# Altium PCB 24V-7A-Power-Board-v2.0.PcbDoc (part 3 of 5)
Units mil, origin at the board's own origin, x right, y up, seen from the top; angles counter-clockwise.
Board outline 4921.26 x 6102.36 mil, 2 copper layers (Top Layer, Bottom Layer); 158 components, 79 nets, 394 pads, 81 vias.
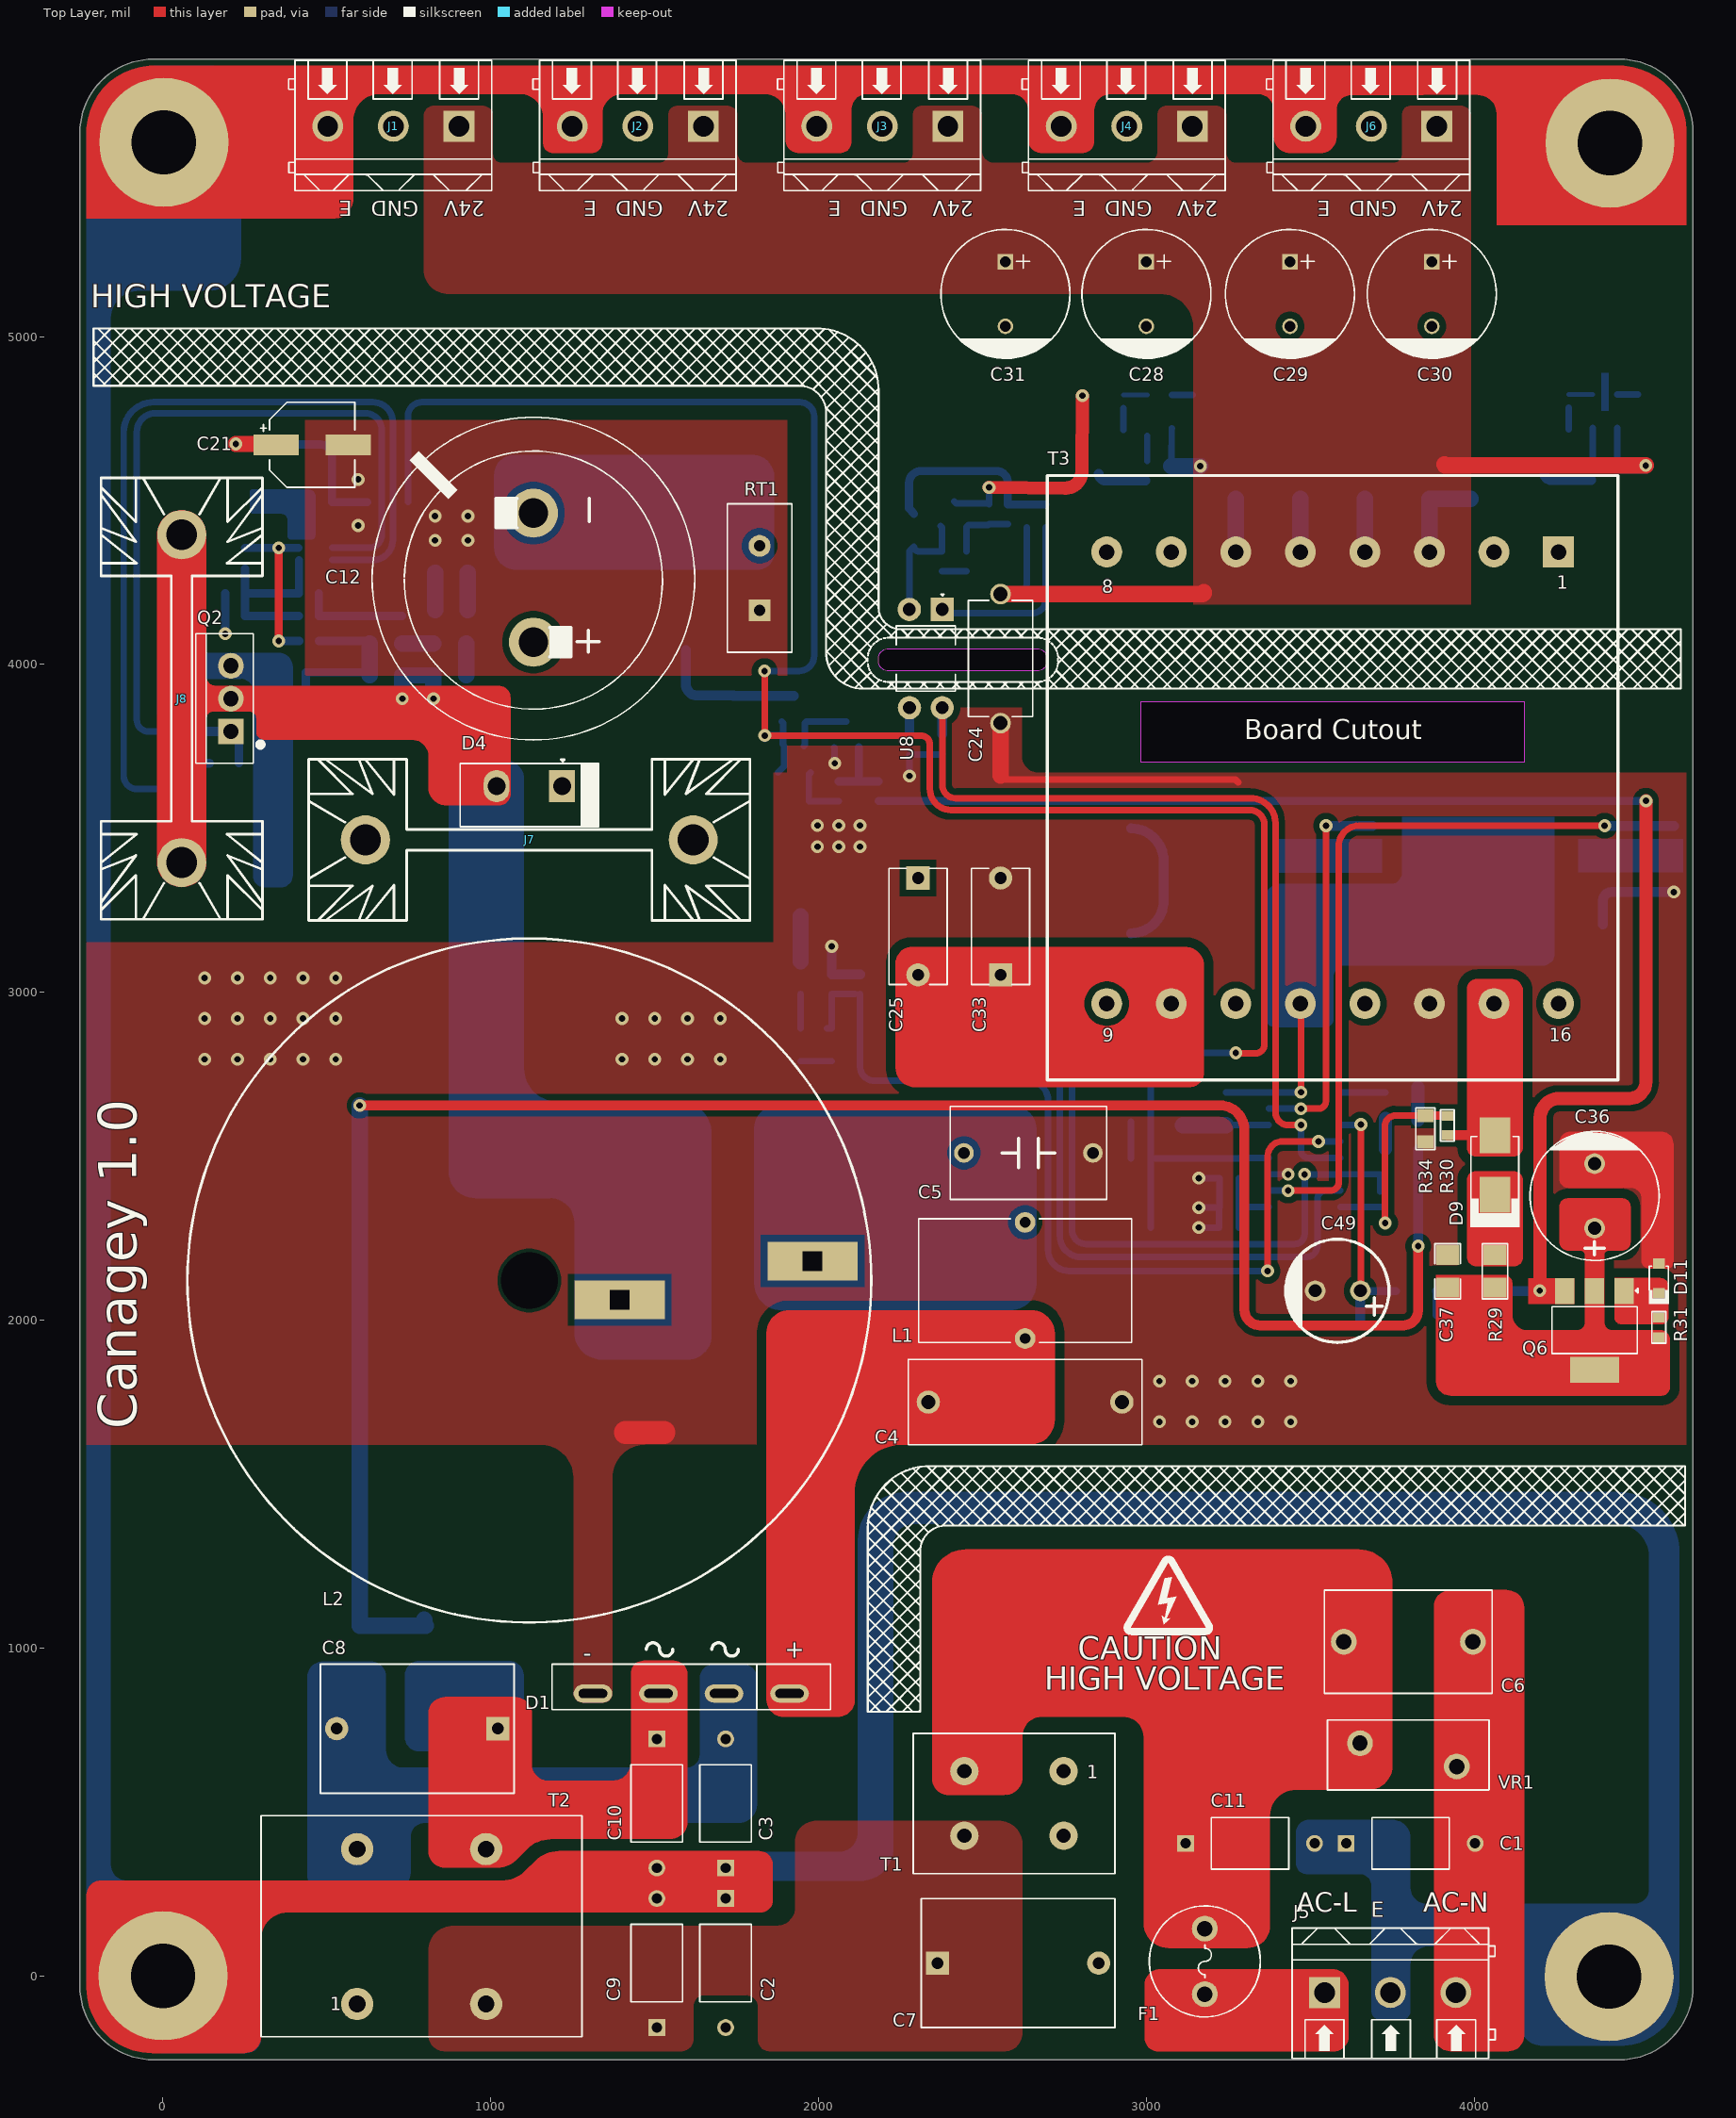
[diagram p0: Top Layer view]

## Part data (continued)
R3 R6 R7 R10: library part RC1206FR-073M3L, "RES 3.3M OHM 1% 1/4W 1206", LCSC Part Number=C137288, Manufacturer=Yageo, Voltage Rating (AC)=200V, ComponentLink1Description=https://datasheet.ciiva.com/11809/0900766b80c6630a-11809505.pdf?src-supplier=Rs, ComponentLink1URL=https://datasheet.ciiva.com/11809/0900766b80c6630a-11809505.pdf?src-supplier=Rs, ComponentLink2Description=https://datasheet.ciiva.com/2511/pyu-rc1206-51-rohs-l-4-2511094.pdf?src-supplier=Digikey, ComponentLink2URL=https://datasheet.ciiva.com/2511/pyu-rc1206-51-rohs-l-4-2511094.pdf?src-supplier=Digikey, ComponentLink3Description=https://datasheet.ciiva.com/2511/pyu-rc1206-51-rohs-l-4-2511095.pdf?src-supplier=Digikey, ComponentLink3URL=https://datasheet.ciiva.com/2511/pyu-rc1206-51-rohs-l-4-2511095.pdf?src-supplier=Digikey, ComponentLink4Description=https://datasheet.ciiva.com/2511/pyu-rc1206-51-rohs-l-4-2511096.pdf?src-supplier=Digikey, ComponentLink4URL=https://datasheet.ciiva.com/2511/pyu-rc1206-51-rohs-l-4-2511096.pdf?src-supplier=Digikey, ComponentLink5Description=https://datasheet.ciiva.com/17420/pyu-rc1206-51-rohs-l-4-17420140.pdf?src-supplier=Future+Electronics, ComponentLink5URL=https://datasheet.ciiva.com/17420/pyu-rc1206-51-rohs-l-4-17420140.pdf?src-supplier=Future+Electronics, Item Type=Resistor, Manufacturer Part Number=RC1206FR-073M3L, Pricing="5000=0.0038, 20000=0.0036, 75000=0.0034, 200000=0.0032, 500000=0.003 (USD)", RoHS=Yes, Stock=130000, Supplier="Future Electronics"
R5 R27 R32: library part CRCW060310R0FKEA, "RES SMD 10 OHM 1% 1/10W 0603", Case Code (Imperial)=0603, Case Code (Metric)=1608, LCSC Part Number=C844919, Manufacturer=Vishay, Max Operating Temperature=155°C, Max Power Dissipation=100mW, Min Operating Temperature=-55°C, Package Quantity=10, Resistance Tolerance=1%, Resistor Type="Thick Film", Temperature Coefficient=100ppm/°C, Voltage Rating=75V, Case/Package=0603, ComponentLink1Description=https://datasheet.ciiva.com/11808/0900766b80d98afc-11808660.pdf?src-supplier=Rs, ComponentLink1URL=https://datasheet.ciiva.com/11808/0900766b80d98afc-11808660.pdf?src-supplier=Rs, ComponentLink2Description=https://datasheet.ciiva.com/26316/fld-crcw-e3-data-en-26316582.pdf?src-supplier=Distrelec, ComponentLink2URL=https://datasheet.ciiva.com/26316/fld-crcw-e3-data-en-26316582.pdf?src-supplier=Distrelec, ComponentLink3Description=https://datasheet.ciiva.com/2465/dcrcwe3-2465700.pdf?src-supplier=Digikey, ComponentLink3URL=https://datasheet.ciiva.com/2465/dcrcwe3-2465700.pdf?src-supplier=Digikey, ComponentLink4Description=https://datasheet.ciiva.com/16781/70201119-16781847.pdf?src-supplier=Allied+Electronics, ComponentLink4URL=https://datasheet.ciiva.com/16781/70201119-16781847.pdf?src-supplier=Allied+Electronics, ComponentLink5Description=https://datasheet.ciiva.com/22673/1697337-22673071.pdf?src-supplier=Element14, ComponentLink5URL=https://datasheet.ciiva.com/22673/1697337-22673071.pdf?src-supplier=Element14, ComponentLink6Description=https://datasheet.ciiva.com/2465/dcrcwe3-2465701.pdf?src-supplier=Digikey, ComponentLink6URL=https://datasheet.ciiva.com/2465/dcrcwe3-2465701.pdf?src-supplier=Digikey, ComponentLink7Description=https://datasheet.ciiva.com/2465/dcrcwe3-2465699.pdf?src-supplier=Digikey, ComponentLink7URL=https://datasheet.ciiva.com/2465/dcrcwe3-2465699.pdf?src-supplier=Digikey, ComponentLink8Description=https://datasheet.ciiva.com/5547/dcrcwe3-109170-5547342.pdf?src-supplier=Mouser, ComponentLink8URL=https://datasheet.ciiva.com/5547/dcrcwe3-109170-5547342.pdf?src-supplier=Mouser, Construction=Rectangular, Contact Plating=Tin, Depth=0.85mm, Features="Automotive AEC-Q200", Height=0.45mm, Item Type=Resistors, Lead Free=5697LeadFree, Length=1.55mm, Manufacturer Part Number=CRCW060310R0FKEA, Military Standard=Not, Number of Terminations=2, Packaging="Tape and Reel", Pins=2, Power Rating=100mW, Pricing="1=0.1, 10=0.017, 50=0.017, 100=0.01, 1000=0.008, 10000=0.005 (USD)", Reach SVHC Compliant=Unknown, RoHS=Yes, RoHS Compliant=Yes, Series=CRCW, Stock=648208, Supplier=Mouser, Technology="THICK FILM", Termination=SMD/SMT, Tolerance=1%, Voltage Rating (DC)=75V, Weight=7.1E-05oz, Width=0.033inch
R8: library part CRCW06031R00FKEA, "RES SMD 1 OHM 1% 1/10W 0603", Case Code (Imperial)=0603, Case Code (Metric)=1608, LCSC Part Number=C844752, Manufacturer="Vishay Dale", Max Operating Temperature=155°C, Max Power Dissipation=100mW, Min Operating Temperature=-55°C, Package Quantity=5000, Ratings=AEC-Q200, Resistance Tolerance=1%, Resistor Type="Thick Film", Temperature Coefficient=100ppm/°C, Voltage Rating=75V, Case/Package=0603, ComponentLink1Description=https://datasheet.ciiva.com/7792/1359337-7792119.pdf?src-supplier=Element14, ComponentLink1URL=https://datasheet.ciiva.com/7792/1359337-7792119.pdf?src-supplier=Element14, ComponentLink2Description=https://datasheet.ciiva.com/3257/dcrcwe3-3257225.pdf?src-supplier=Avnet, ComponentLink2URL=https://datasheet.ciiva.com/3257/dcrcwe3-3257225.pdf?src-supplier=Avnet, ComponentLink3Description=https://datasheet.ciiva.com/2465/dcrcwe3-2465530.pdf?src-supplier=Digikey, ComponentLink3URL=https://datasheet.ciiva.com/2465/dcrcwe3-2465530.pdf?src-supplier=Digikey, ComponentLink4Description=https://datasheet.ciiva.com/2465/dcrcwe3-2465528.pdf?src-supplier=Digikey, ComponentLink4URL=https://datasheet.ciiva.com/2465/dcrcwe3-2465528.pdf?src-supplier=Digikey, ComponentLink5Description=https://datasheet.ciiva.com/5541/dcrcwe3-109170-5541726.pdf?src-supplier=Mouser, ComponentLink5URL=https://datasheet.ciiva.com/5541/dcrcwe3-109170-5541726.pdf?src-supplier=Mouser, Construction=Rectangular, Contact Plating=Tin, Depth=0.85mm, Features="Automotive AEC-Q200", Height=0.45mm, Item Type=Resistor, Lead Free=5697LeadFree, Length=1.55mm, Manufacturer Part Number=CRCW06031R00FKEA, Military Standard=Not, Number of Terminations=2, Packaging="Tape and Reel", Pins=2, Power Rating=100mW, Pricing="1=0.1, 10=0.024, 50=0.024, 100=0.014, 1000=0.011, 10000=0.006 (USD)", Radiation Hardening=No, Reach SVHC Compliant=Unknown, RoHS=Yes, RoHS Compliant=Yes, Series=CRCW, Stock=303523, Supplier=Mouser, Termination=SMD/SMT, Tolerance=1%, Voltage Rating (DC)=75V, Weight=7.1E-05oz, Width=0.85mm
R9: library part RC0603FR-0782K5L, "RES 82.5K OHM 1% 1/10W 0603", LCSC Part Number=C185310, Manufacturer=Yageo, Voltage Rating (DC)=50V, ComponentLink1Description=https://datasheet.ciiva.com/2519/pyu-r-int-thick-7-2519111.pdf?src-supplier=Digikey, ComponentLink1URL=https://datasheet.ciiva.com/2519/pyu-r-int-thick-7-2519111.pdf?src-supplier=Digikey, ComponentLink2Description=https://datasheet.ciiva.com/2519/pyu-r-int-thick-7-2519112.pdf?src-supplier=Digikey, ComponentLink2URL=https://datasheet.ciiva.com/2519/pyu-r-int-thick-7-2519112.pdf?src-supplier=Digikey, ComponentLink3Description=https://datasheet.ciiva.com/2519/pyu-r-int-thick-7-2519113.pdf?src-supplier=Digikey, ComponentLink3URL=https://datasheet.ciiva.com/2519/pyu-r-int-thick-7-2519113.pdf?src-supplier=Digikey, Item Type=Resistor, Lead Free=5697LeadFree, Manufacturer Part Number=RC0603FR-0782K5L, Pricing="5000=0.00112 (USD)", RoHS=Yes, Stock=165000, Supplier=Avnet
R11: library part RC0603FR-0736K5L, "RES 36.5K OHM 1% 1/10W 0603", LCSC Part Number=C137738, Manufacturer=YAGEO, Package=0603, ComponentLink1Description=LCSC, ComponentLink1URL=https://www.lcsc.com/product-detail/Chip-Resistor-Surface-Mount_YAGEO-RC0603FR-0736K5L_C137738.html, Item Type=Resistor, Manufacturer Part Number=RC0603FR-0736K5L
R12: library part RC0603FR-07120KL, "RES 120K OHM 1% 1/10W 0603", Case Code (Imperial)=0603, Case Code (Metric)=1608, LCSC Part Number=C114607, Manufacturer=Yageo, Max Operating Temperature=155°C, Max Power Dissipation=100mW, Min Operating Temperature=-55°C, Package Quantity=5000, Resistance Tolerance=1%, Resistor Type="Thick Film", Temperature Coefficient=100ppm/°C, Voltage Rating=50V, Working Voltage=75V, Case/Package=0603, ComponentLink1Description=https://datasheet.ciiva.com/11808/0900766b80f96399-11808757.pdf?src-supplier=Rs, ComponentLink1URL=https://datasheet.ciiva.com/11808/0900766b80f96399-11808757.pdf?src-supplier=Rs, ComponentLink2Description=https://datasheet.ciiva.com/2454/pyu-r-int-thick-7-2454739.pdf?src-supplier=Digikey, ComponentLink2URL=https://datasheet.ciiva.com/2454/pyu-r-int-thick-7-2454739.pdf?src-supplier=Digikey, ComponentLink3Description=https://datasheet.ciiva.com/2454/pyu-r-int-thick-7-2454740.pdf?src-supplier=Digikey, ComponentLink3URL=https://datasheet.ciiva.com/2454/pyu-r-int-thick-7-2454740.pdf?src-supplier=Digikey, ComponentLink4Description=https://datasheet.ciiva.com/2454/pyu-r-int-thick-7-2454738.pdf?src-supplier=Digikey, ComponentLink4URL=https://datasheet.ciiva.com/2454/pyu-r-int-thick-7-2454738.pdf?src-supplier=Digikey, ComponentLink5Description=https://datasheet.ciiva.com/7746/443971-7746247.pdf?src-supplier=Element14, ComponentLink5URL=https://datasheet.ciiva.com/7746/443971-7746247.pdf?src-supplier=Element14, ComponentLink6Description=https://datasheet.ciiva.com/7746/443971-7746246.pdf?src-supplier=Element14, ComponentLink6URL=https://datasheet.ciiva.com/7746/443971-7746246.pdf?src-supplier=Element14, Depth=0.8mm, Features="Moisture Resistant", Height=0.022inch, Item Type=Resistors, Lead Free=5697LeadFree, Lead Pitch=2.54mm, Length=0.063inch, Manufacturer Part Number=RC0603FR-07120KL, Number of Terminations=2, Packaging="Tape and Reel", Pins=2, Power Rating=100mW, Pricing="5000=0.0022, 50000=0.0021, 150000=0.0021, 375000=0.002, 1000000=0.0019 (USD)", Radiation Hardening=5898YesNo, Reach SVHC Compliant=Unknown, RoHS=Yes, RoHS Compliant=Yes, Series=RC, Stock=3405000, Supplier="Future Electronics", Technology="THICK FILM", Termination=SMD/SMT, Tolerance=1%, Voltage Rating (AC)=50V, Voltage Rating (DC)=50V, Width=0.031inch
R13: library part RC0603FR-073KL, "RES 3K OHM 1% 1/10W 0603", Case Code (Imperial)=0603, Case Code (Metric)=1608, LCSC Part Number=C126358, Manufacturer=Yageo, Max Operating Temperature=155°C, Max Power Dissipation=100mW, Min Operating Temperature=-55°C, Resistance Tolerance=1%, Resistor Type="Thick Film", Temperature Coefficient=100ppm/°C, Voltage Rating=50V, Case/Package=0603, ComponentLink1Description=http://www.farnell.com/datasheets/2167052.pdf?src-supplier=Farnell, ComponentLink1URL=http://www.farnell.com/datasheets/2167052.pdf?src-supplier=Farnell, ComponentLink2Description=http://www.mouser.com/ds/2/447/RC0603-272842.pdf?src-supplier=Mouser, ComponentLink2URL=http://www.mouser.com/ds/2/447/RC0603-272842.pdf?src-supplier=Mouser, ComponentLink3Description=https://www.verical.com/server-webapp/html/getDatasheet?partID=135099&src-supplier=Verical, ComponentLink3URL=https://www.verical.com/server-webapp/html/getDatasheet?partID=135099&src-supplier=Verical, ComponentLink4Description=http://www.farnell.com/datasheets/2167052.pdf?src-supplier=Element14, ComponentLink4URL=http://www.farnell.com/datasheets/2167052.pdf?src-supplier=Element14, ComponentLink5Description=http://www.yageo.com/documents/recent/PYu-RC_Group_51_RoHS_L_10.pdf?src-supplier=Digikey, ComponentLink5URL=http://www.yageo.com/documents/recent/PYu-RC_Group_51_RoHS_L_10.pdf?src-supplier=Digikey, ComponentLink6Description=http://www.yageo.com/documents/recent/PYu-RC_Group_51_RoHS_L_9.pdf?src-supplier=Digikey, ComponentLink6URL=http://www.yageo.com/documents/recent/PYu-RC_Group_51_RoHS_L_9.pdf?src-supplier=Digikey, ComponentLink7Description=https://datasheet.octopart.com/RC0603FR-073KL-Yageo-datasheet-8328172.pdf?src-supplier=Farnell, ComponentLink7URL=https://datasheet.octopart.com/RC0603FR-073KL-Yageo-datasheet-8328172.pdf?src-supplier=Farnell, ComponentLink8Description=http://www.yageo.com/documents/recent/PYu-RC0603_51_RoHS_L_7.pdf?src-supplier=Future+Electronics, ComponentLink8URL=http://www.yageo.com/documents/recent/PYu-RC0603_51_RoHS_L_7.pdf?src-supplier=Future+Electronics, ComponentLink9Description=https://datasheet.octopart.com/RC0603FR-073KL-Yageo-datasheet-34211833.pdf?src-supplier=Element14, ComponentLink9URL=https://datasheet.octopart.com/RC0603FR-073KL-Yageo-datasheet-34211833.pdf?src-supplier=Element14, ComponentLink10Description=http://www.farnell.com/datasheets/1868787.pdf?src-supplier=Newark, ComponentLink10URL=http://www.farnell.com/datasheets/1868787.pdf?src-supplier=Newark, ComponentLink11Description=https://datasheet.octopart.com/RC0603FR-073KL-Yageo-datasheet-164759695.pdf?src-supplier=Future+Electronics, ComponentLink11URL=https://datasheet.octopart.com/RC0603FR-073KL-Yageo-datasheet-164759695.pdf?src-supplier=Future+Electronics, Construction=Rectangular, Depth=0.8mm, Features="Moisture Resistant", Item Type=Resistor, Lead Free=5697LeadFree, Length=1.6mm, Manufacturer Part Number=RC0603FR-073KL, Military Standard=Not, Number of Terminations=2, Packaging="Tape and Reel", Pins=2NUMBER, Power Rating=100mW, Reach SVHC Compliant=No, RoHS=Yes, RoHS Compliant=Yes, Series=RC, Supplier=Avnet, Termination=SMD/SMT, Tolerance=1%, Voltage Rating (DC)=50V, Width=800um
R14: library part CRCW080510R0FKEAHP, "RES SMD 10 OHM 1% 1/2W 0805", Case Code (Imperial)=0805, Case Code (Metric)=2012, LCSC Part Number=C844598, Manufacturer=Vishay, Max Operating Temperature=155°C, Max Power Dissipation=333mW, Min Operating Temperature=-55°C, Package Quantity=5000, Power Rating=330mW, Ratings=AEC-Q200, Resistance Tolerance=1%, Resistor Type="Thick Film", Temperature Coefficient=100ppm/°C, Voltage Rating=150V, Case/Package=0805, ComponentLink1Description=http://www.farnell.com/datasheets/2884039.pdf?src-supplier=Newark, ComponentLink1URL=http://www.farnell.com/datasheets/2884039.pdf?src-supplier=Newark, ComponentLink2Description=https://datasheet.octopart.com/CRCW080510R0FKEAHP-Vishay-datasheet-87136057.pdf?src-supplier=Newark, ComponentLink2URL=https://datasheet.octopart.com/CRCW080510R0FKEAHP-Vishay-datasheet-87136057.pdf?src-supplier=Newark, ComponentLink3Description=http://www.vishay.com/docs/20043/crcwhpe3.pdf?src-supplier=Digikey, ComponentLink3URL=http://www.vishay.com/docs/20043/crcwhpe3.pdf?src-supplier=Digikey, Construction=Rectangular, Contact Plating=Tin, Depth=1.25mm, Features="Automotive AEC-Q200", Height=0.5mm, Item Type=Resistor, Lead Free="Lead Free", Length=2mm, Manufacturer Part Number=CRCW080510R0FKEAHP, Military Standard=Not, Number of Terminations=2, Packaging="Tape and Reel", Pricing="1=0.19, 10=0.066, 50=0.066, 100=0.04, 1000=0.027, 10000=0.023 (USD)", Radiation Hardening=No, Reach SVHC Compliant=Unknown, RoHS=Yes, RoHS Compliant=Yes, Series=CRCW-HP, Stock=384044, Supplier=Mouser, Technology="THICK FILM", Termination=SMD/SMT, Tolerance=1%, Voltage Rating (DC)=150V, Weight=0.000194oz, Width=1.2mm
R15: library part RC0603FR-0724K3L, "RES 24.3K OHM 1% 1/10W 0603", Manufacturer=Yageo, Supplier Part Number=6938161, Voltage Rating (DC)=50V, ComponentLink1Description=https://datasheet.ciiva.com/15189/getdatasheetpartid-326710-15189669.pdf?src-supplier=Verical, ComponentLink1URL=https://datasheet.ciiva.com/15189/getdatasheetpartid-326710-15189669.pdf?src-supplier=Verical, Item Type=Resistors, Lead Free=5697LeadFree, Manufacturer Part Number=RC0603FR-0724K3L, Pricing="5000=0.0015, 50000=0.0014, 150000=0.0014, 375000=0.0013, 1000000=0.0012 (USD)", RoHS=Yes, Stock=440000, Supplier="Future Electronics"
R16: library part CRCW0603100KFKEA, "RES SMD 100K OHM 1% 1/10W 0603", Case Code (Imperial)=0603, Case Code (Metric)=1608, Case/Package=345Case, LCSC Part Number=C844916, Max Operating Temperature=155°C, Min Operating Temperature=-55°C, Power Rating=100mW, Resistance Tolerance=1%, Resistor Type="Thick Film", Supplier Part Number=71-CRCW0603-100K-E3, Temperature Coefficient=100ppm/°C, Voltage Rating=75V, Category="Chip SMD Resistors", ComponentLink1Description=LCSC, ComponentLink2Description=http://www.farnell.com/datasheets/2310790.pdf?src-supplier=Farnell, ComponentLink2URL=http://www.farnell.com/datasheets/2310790.pdf?src-supplier=Farnell, ComponentLink3Description=https://datasheet.octopart.com/CRCW0603100KFKEA-Vishay-datasheet-14722531.pdf?src-supplier=Newark, ComponentLink3URL=https://datasheet.octopart.com/CRCW0603100KFKEA-Vishay-datasheet-14722531.pdf?src-supplier=Newark, ComponentLink4Description=https://www.vishay.com/docs/20035/dcrcwe3.pdf?src-supplier=Digi-Key, ComponentLink4URL=https://www.vishay.com/docs/20035/dcrcwe3.pdf?src-supplier=Digi-Key, ComponentLink5Description=https://datasheet.octopart.com/CRCW0603100KFKEA-Vishay-datasheet-5300368.pdf?src-supplier=Future+Electronics, ComponentLink5URL=https://datasheet.octopart.com/CRCW0603100KFKEA-Vishay-datasheet-5300368.pdf?src-supplier=Future+Electronics, ComponentLink6Description=http://www.farnell.com/datasheets/2310790.pdf?src-supplier=Newark, ComponentLink6URL=http://www.farnell.com/datasheets/2310790.pdf?src-supplier=Newark, ComponentLink7Description=http://www.farnell.com/datasheets/2310790.pdf?src-supplier=Element14, ComponentLink7URL=http://www.farnell.com/datasheets/2310790.pdf?src-supplier=Element14, ComponentLink8Description=https://datasheet.octopart.com/CRCW0603100KFKEA-Vishay-datasheet-83961561.pdf?src-supplier=Element14, ComponentLink8URL=https://datasheet.octopart.com/CRCW0603100KFKEA-Vishay-datasheet-83961561.pdf?src-supplier=Element14, ComponentLink9Description=https://datasheet.octopart.com/CRCW0603100KFKEA-Vishay-datasheet-8363642.pdf?src-supplier=Verical, ComponentLink9URL=https://datasheet.octopart.com/CRCW0603100KFKEA-Vishay-datasheet-8363642.pdf?src-supplier=Verical, ComponentLink10Description=https://datasheet.octopart.com/CRCW0603100KFKEA-Vishay-datasheet-508714.pdf?src-supplier=Farnell, ComponentLink10URL=https://datasheet.octopart.com/CRCW0603100KFKEA-Vishay-datasheet-508714.pdf?src-supplier=Farnell, ComponentLink11Description=https://datasheet.octopart.com/CRCW0603100KFKEA-Vishay-datasheet-17834126.pdf?src-supplier=TME, ComponentLink11URL=https://datasheet.octopart.com/CRCW0603100KFKEA-Vishay-datasheet-17834126.pdf?src-supplier=TME, Features=6309FeaturesType, Height=500um, Item Type=Resistor, Lead Free=5697LeadFree, Packaging=13Packaging, Pins=2NUMBER, Pricing="1=0.1, 10=0.019, 50=0.019, 100=0.009, 1000=0.007, 10000=0.004 (USD)", RoHS=Yes, RoHS Compliant=Yes, Stock=716604, Supplier=Mouser, Tolerance=1%, Voltage Rating (DC)=75V
R17 R25: library part RC0603FR-07390KL, "RES 390K OHM 1% 1/10W 0603", Case Code (Imperial)=0603, Case Code (Metric)=1608, LCSC Part Number=C137735, Manufacturer=Yageo, Max Operating Temperature=155°C, Max Power Dissipation=100mW, Min Operating Temperature=-55°C, Resistance Tolerance=1%, Resistor Type="Thick Film", Temperature Coefficient=100ppm/°C, Voltage Rating=50V, Working Voltage=75V, Case/Package=0603, ComponentLink1Description=https://datasheet.ciiva.com/11819/0900766b80f96399-11819357.pdf?src-supplier=Rs, ComponentLink1URL=https://datasheet.ciiva.com/11819/0900766b80f96399-11819357.pdf?src-supplier=Rs, ComponentLink2Description=https://datasheet.ciiva.com/5557/rc0603-5557952.pdf?src-supplier=Mouser, ComponentLink2URL=https://datasheet.ciiva.com/5557/rc0603-5557952.pdf?src-supplier=Mouser, ComponentLink3Description=https://datasheet.ciiva.com/2454/pyu-r-int-thick-7-2454247.pdf?src-supplier=Digikey, ComponentLink3URL=https://datasheet.ciiva.com/2454/pyu-r-int-thick-7-2454247.pdf?src-supplier=Digikey, ComponentLink4Description=https://datasheet.ciiva.com/2454/pyu-r-int-thick-7-2454248.pdf?src-supplier=Digikey, ComponentLink4URL=https://datasheet.ciiva.com/2454/pyu-r-int-thick-7-2454248.pdf?src-supplier=Digikey, ComponentLink5Description=https://datasheet.ciiva.com/2454/pyu-r-int-thick-7-2454246.pdf?src-supplier=Digikey, ComponentLink5URL=https://datasheet.ciiva.com/2454/pyu-r-int-thick-7-2454246.pdf?src-supplier=Digikey, Construction=Rectangular, Depth=0.8mm, Features="Moisture Resistant", Height=0.45mm, Item Type=Resistor, Lead Free=5697LeadFree, Length=1.6mm, Manufacturer Part Number=RC0603FR-07390KL, Military Standard=Not, Number of Terminations=2, Packaging="Tape and Reel", Pins=2, Power Rating=100mW, Pricing="1=0.104, 25=0.011, 50=0.009, 100=0.006 (USD)", Reach SVHC Compliant=Unknown, RoHS=Yes, RoHS Compliant=Yes, Series=RC, Stock=3700, Supplier=Avnet, Technology="THICK FILM", Termination=SMD/SMT, Tolerance=1%, Voltage Rating (AC)=50V, Voltage Rating (DC)=50V, Width=0.8mm
R18 R19: library part RC0603FR-0775KL, "RES 75K OHM 1% 1/10W 0603", Case Code (Imperial)=0603, Case Code (Metric)=1608, LCSC Part Number=C114636, Manufacturer=Yageo, Max Operating Temperature=155°C, Max Power Dissipation=100mW, Min Operating Temperature=-55°C, Resistance Tolerance=1%, Resistor Type="Thick Film", Temperature Coefficient=100ppm/°C, Voltage Rating=50V, Case/Package=0603, ComponentLink1Description=https://datasheet.ciiva.com/11808/0900766b80f96399-11808100.pdf?src-supplier=Rs, ComponentLink1URL=https://datasheet.ciiva.com/11808/0900766b80f96399-11808100.pdf?src-supplier=Rs, ComponentLink2Description=https://datasheet.ciiva.com/15189/getdatasheetpartid-326733-15189816.pdf?src-supplier=Verical, ComponentLink2URL=https://datasheet.ciiva.com/15189/getdatasheetpartid-326733-15189816.pdf?src-supplier=Verical, ComponentLink3Description=https://datasheet.ciiva.com/2455/pyu-r-int-thick-7-2455324.pdf?src-supplier=Digikey, ComponentLink3URL=https://datasheet.ciiva.com/2455/pyu-r-int-thick-7-2455324.pdf?src-supplier=Digikey, ComponentLink4Description=https://datasheet.ciiva.com/2455/pyu-r-int-thick-7-2455325.pdf?src-supplier=Digikey, ComponentLink4URL=https://datasheet.ciiva.com/2455/pyu-r-int-thick-7-2455325.pdf?src-supplier=Digikey, ComponentLink5Description=https://datasheet.ciiva.com/2455/pyu-r-int-thick-7-2455323.pdf?src-supplier=Digikey, ComponentLink5URL=https://datasheet.ciiva.com/2455/pyu-r-int-thick-7-2455323.pdf?src-supplier=Digikey, ComponentLink6Description=https://datasheet.ciiva.com/46395/443971-46395017.pdf?src-supplier=Element14, ComponentLink6URL=https://datasheet.ciiva.com/46395/443971-46395017.pdf?src-supplier=Element14, Construction=Rectangular, Depth=0.8mm, Features="Moisture Resistant", Height=0.45mm, Item Type=Resistor, Lead Free=5697LeadFree, Length=1.6mm, Manufacturer Part Number=RC0603FR-0775KL, Military Standard=Not, Number of Terminations=2, Packaging="Tape and Reel", Pins=2NUMBER, Power Rating=100mW, Pricing="5000=0.0015, 75000=0.0015, 250000=0.0014, 750000=0.0013, 2500000=0.0012 (USD)", Reach SVHC Compliant=No, RoHS=Yes, RoHS Compliant=Yes, Series=RC, Stock=550000, Supplier="Future Electronics", Technology="THICK FILM", Termination=SMD/SMT, Tolerance=1%, Voltage Rating (DC)=50V
R20: library part RC0603FR-07140KL, "RES 140K OHM 1% 1/10W 0603", LCSC Part Number=C185372, Manufacturer=Yageo, Voltage Rating (DC)=50V, ComponentLink1Description=https://datasheet.ciiva.com/2453/pyu-r-int-thick-7-2453916.pdf?src-supplier=Digikey, ComponentLink1URL=https://datasheet.ciiva.com/2453/pyu-r-int-thick-7-2453916.pdf?src-supplier=Digikey, ComponentLink2Description=https://datasheet.ciiva.com/2453/pyu-r-int-thick-7-2453917.pdf?src-supplier=Digikey, ComponentLink2URL=https://datasheet.ciiva.com/2453/pyu-r-int-thick-7-2453917.pdf?src-supplier=Digikey, ComponentLink3Description=https://datasheet.ciiva.com/2453/pyu-r-int-thick-7-2453918.pdf?src-supplier=Digikey, ComponentLink3URL=https://datasheet.ciiva.com/2453/pyu-r-int-thick-7-2453918.pdf?src-supplier=Digikey, Item Type=Resistor, Lead Free=5697LeadFree, Manufacturer Part Number=RC0603FR-07140KL, Pricing="5000=0.0015, 50000=0.0014, 150000=0.0014, 375000=0.0013, 1000000=0.0012 (USD)", RoHS=Yes, Stock=215000, Supplier="Future Electronics"
R21 R22: library part CSR1206FTR130, "500mW Thick Film Resistors ±100ppm/℃ ±1% 130mΩ 1206 Chip Resistor - Surface Mount ROHS", LCSC Part Number=C346779, Manufacturer="SEI(Stackpole Elec)", Package=1206, ComponentLink1Description=LCSC, ComponentLink1URL=https://www.lcsc.com/product-detail/Chip-Resistor-Surface-Mount_SEI-Stackpole-Elec-CSR1206FTR130_C346779.html, Item Type=Resistor, Manufacturer Part Number=CSR1206FTR130
R23 R24: library part RL1206FR-7W0R15L, "RES 0.15 OHM 1% 1/2W 1206", LCSC Part Number=C859925, Manufacturer=YAGEO, Package=1206, ComponentLink1Description=LCSC, ComponentLink1URL=https://www.lcsc.com/product-detail/Chip-Resistor-Surface-Mount_YAGEO-RL1206FR-7W0R15L_C859925.html, Item Type=Resistor, Manufacturer Part Number=RL1206FR-7W0R15L
R26: library part RC0603FR-0749K9L, "RES 49.9K OHM 1% 1/10W 0603", Case Code (Imperial)=0603, Case Code (Metric)=1608, LCSC Part Number=C114624, Manufacturer=Yageo, Max Operating Temperature=155°C, Max Power Dissipation=100mW, Min Operating Temperature=-55°C, Package Quantity=1, Resistance=49.9kR, Resistor Type="Thick Film", Supplier Part Number 1=311-49.9KHRCT-ND, Temperature Coefficient=100ppm/°C, Tolerance=1%, Voltage Rating=50V, Case/Package=0603, Category="Chip SMD Resistors", ComponentLink1Description=https://datasheet.ciiva.com/2454/pyu-r-int-thick-7-2454042.pdf?src-supplier=Digi-Key, ComponentLink1URL=https://datasheet.ciiva.com/2454/pyu-r-int-thick-7-2454042.pdf?src-supplier=Digi-Key, ComponentLink2Description=https://datasheet.ciiva.com/2454/pyu-r-int-thick-7-2454043.pdf?src-supplier=Digi-Key, ComponentLink2URL=https://datasheet.ciiva.com/2454/pyu-r-int-thick-7-2454043.pdf?src-supplier=Digi-Key, ComponentLink3Description=https://datasheet.ciiva.com/2454/pyu-r-int-thick-7-2454044.pdf?src-supplier=Digi-Key, ComponentLink3URL=https://datasheet.ciiva.com/2454/pyu-r-int-thick-7-2454044.pdf?src-supplier=Digi-Key, ComponentLink4Description=https://datasheet.ciiva.com/15189/getdatasheetpartid-323805-15189749.pdf?src-supplier=Verical, ComponentLink4URL=https://datasheet.ciiva.com/15189/getdatasheetpartid-323805-15189749.pdf?src-supplier=Verical, Construction=Rectangular, Depth=0.8mm, Features="Moisture Resistant", Height=0.022inch, Item Type=Resistor, Lead Free="Lead Free", Length=0.063inch, Manufacturer Part Number=RC0603FR-0749K9L, Military Standard=Not, Mount="Surface Mount", Number of Terminations=2, Packaging="Tape and Reel", Power Rating=100mW, Pricing 1="1=0.10000, 10=0.02400, 100=0.00970, 1000=0.00436, 2500=0.00378 (USD)", RoHS=Yes, RoHS Compliant=Yes, Series=RC, Size Code=0603, Stock 1=77863, Supplier 1=Digi-Key, Termination=SMD/SMT, Voltage Rating (DC)=50V, Width=0.031inch
R28 R33: library part RC0805FR-7W10KL, "RES 10K OHM 1% 1/4W 0805", LCSC Part Number=C723404, Manufacturer=Yageo, Supplier Part Number=49AK3472, Category="Chip SMD Resistors", Item Type=Resistor, Manufacturer Part Number=RC0805FR-7W10KL, Pricing="1=0.153, 25=0.038, 50=0.03, 100=0.02 (USD)", RoHS=Yes, Stock=5000, Supplier=Avnet
R29: library part CRCW12060000Z0EA, "RES SMD 0 OHM JUMPER 1/4W 1206", Case Code (Imperial)=1206, Case Code (Metric)=3216, LCSC Part Number=C190124, Manufacturer=Vishay, Max Operating Temperature=155°C, Max Power Dissipation=250mW, Min Operating Temperature=-55°C, Package Quantity=5000, Ratings=AEC-Q200, Resistor Type="Thick Film", Temperature Coefficient=100ppm/°C, Tolerance=1%, Voltage Rating=200V, Case/Package=1206, ComponentLink1Description=https://datasheet.ciiva.com/7841/1720486-7841862.pdf?src-supplier=Element14, ComponentLink1URL=https://datasheet.ciiva.com/7841/1720486-7841862.pdf?src-supplier=Element14, Construction=Rectangular, Contact Plating=Tin, Depth=1.6mm, Features="Automotive AEC-Q200", Height=0.55mm, Item Type=Resistor, Lead Free=5697LeadFree, Length=3.2mm, Manufacturer Part Number=CRCW12060000Z0EA, Military Standard=Not, Number of Terminations=2, Packaging="Tape and Reel", Power Rating=250mW, Pricing="1=0.1, 10=0.039, 50=0.039, 100=0.018, 1000=0.013, 10000=0.007 (USD)", Radiation Hardening=No, Reach SVHC Compliant=Unknown, RoHS=Yes, RoHS Compliant=Yes, Series=CRCW, Stock=852938, Supplier=Mouser, Technology="THICK FILM", Termination=SMD/SMT, Voltage Rating (DC)=200V, Weight=0.000353oz, Width=1.6mm
R30: library part CRGH0603F26K1, "RES SMD 26.1K OHM 1% 1/5W 0603", Case Code (Imperial)=0603, Case Code (Metric)=1608, LCSC Part Number=C4086912, Manufacturer="TE Connectivity", Max Operating Temperature=155°C, Max Power Dissipation=200mW, Min Operating Temperature=-55°C, Number of Resistors=1, Resistor Type="Thick Film,Power resistor", Temperature Coefficient=100ppm/°C, Tolerance=1%, Voltage Rating=50V, Case/Package=0603, ComponentLink1Description=http://www.mouser.com/ds/2/418/NG_DS_1773204-1_C-717624.pdf?src-supplier=Mouser, ComponentLink1URL=http://www.mouser.com/ds/2/418/NG_DS_1773204-1_C-717624.pdf?src-supplier=Mouser, ComponentLink2Description=https://www.te.com/commerce/DocumentDelivery/DDEController?Action=srchrtrv&amp;DocNm=1773204-1&amp;DocType=DS&amp;DocLang=English&src-supplier=Digikey, ComponentLink2URL=https://www.te.com/commerce/DocumentDelivery/DDEController?Action=srchrtrv&amp;DocNm=1773204-1&amp;DocType=DS&amp;DocLang=English&src-supplier=Digikey, ELV=Compliant, Height=0.45mm, Item Type=Resistor, Length=1.6mm, Manufacturer Part Number=CRGH0603F26K1, Mounting Technology="Surface Mount", Number of Terminations=2, Packaging="Tape and Reel", Power Rating=200mW, Pricing="20000=0.00865 (USD)", RoHS=Yes, RoHS Compliant=Yes, Series="CRGH, Neohm", Supplier=Digikey, Termination=Solder, Width=0.8mm
R31: library part CRCW06037K15FKEA, "RES SMD 7.15K OHM 1% 1/10W 0603", LCSC Part Number=C844382, Manufacturer=Vishay, ComponentLink1Description=https://datasheet.ciiva.com/11810/0900766b80d98afc-11810198.pdf?src-supplier=Rs, ComponentLink1URL=https://datasheet.ciiva.com/11810/0900766b80d98afc-11810198.pdf?src-supplier=Rs, ComponentLink2Description=https://datasheet.ciiva.com/22707/1697337-22707757.pdf?src-supplier=Element14, ComponentLink2URL=https://datasheet.ciiva.com/22707/1697337-22707757.pdf?src-supplier=Element14, ComponentLink3Description=https://datasheet.ciiva.com/7679/1697337-7679142.pdf?src-supplier=Element14, ComponentLink3URL=https://datasheet.ciiva.com/7679/1697337-7679142.pdf?src-supplier=Element14, ComponentLink4Description=https://datasheet.ciiva.com/7679/1697337-7679143.pdf?src-supplier=Element14, ComponentLink4URL=https://datasheet.ciiva.com/7679/1697337-7679143.pdf?src-supplier=Element14, ComponentLink5Description=https://datasheet.ciiva.com/16397/dcrcwe3-16397317.pdf?src-supplier=Future+Electronics, ComponentLink5URL=https://datasheet.ciiva.com/16397/dcrcwe3-16397317.pdf?src-supplier=Future+Electronics, ComponentLink6Description=https://datasheet.ciiva.com/2466/dcrcwe3-2466245.pdf?src-supplier=Digikey, ComponentLink6URL=https://datasheet.ciiva.com/2466/dcrcwe3-2466245.pdf?src-supplier=Digikey, ComponentLink7Description=https://datasheet.ciiva.com/2466/dcrcwe3-2466246.pdf?src-supplier=Digikey, ComponentLink7URL=https://datasheet.ciiva.com/2466/dcrcwe3-2466246.pdf?src-supplier=Digikey, ComponentLink8Description=https://datasheet.ciiva.com/2466/dcrcwe3-2466247.pdf?src-supplier=Digikey, ComponentLink8URL=https://datasheet.ciiva.com/2466/dcrcwe3-2466247.pdf?src-supplier=Digikey, ComponentLink9Description=https://datasheet.ciiva.com/3257/dcrcwe3-3257899.pdf?src-supplier=Avnet, ComponentLink9URL=https://datasheet.ciiva.com/3257/dcrcwe3-3257899.pdf?src-supplier=Avnet, Item Type=Resistor, Lead Free=5697LeadFree, Manufacturer Part Number=CRCW06037K15FKEA, Pricing="1=0.1, 10=0.019, 50=0.019, 100=0.009, 1000=0.007, 10000=0.004 (USD)", RoHS=Yes, Stock=18619, Supplier=Mouser
R34: library part CRCW08055K60FKEA, "RES SMD 5.6K OHM 1% 1/8W 0805", Case Code (Imperial)=0805, Case Code (Metric)=2012, LCSC Part Number=C844634, Manufacturer=Vishay, Max Operating Temperature=155°C, Max Power Dissipation=125mW, Min Operating Temperature=-55°C, Package Quantity=5000, Ratings=AEC-Q200, Resistance Tolerance=1%, Resistor Type="Thick Film", Supplier Part Number=6791572P, Temperature Coefficient=100ppm/°C, Voltage Rating=150V, Case/Package=0805, Category="Chip SMD Resistors", ComponentLink1Description=https://datasheet.ciiva.com/11811/0900766b80d98b26-11811062.pdf?src-supplier=Rs, ComponentLink1URL=https://datasheet.ciiva.com/11811/0900766b80d98b26-11811062.pdf?src-supplier=Rs, ComponentLink2Description=https://datasheet.ciiva.com/2525/dcrcwe3-2525722.pdf?src-supplier=Digi-Key, ComponentLink2URL=https://datasheet.ciiva.com/2525/dcrcwe3-2525722.pdf?src-supplier=Digi-Key, ComponentLink3Description=https://datasheet.ciiva.com/16767/70201119-16767127.pdf?src-supplier=Allied+Electronics, ComponentLink3URL=https://datasheet.ciiva.com/16767/70201119-16767127.pdf?src-supplier=Allied+Electronics, ComponentLink4Description=https://datasheet.ciiva.com/7841/1697337-7841861.pdf?src-supplier=Element14, ComponentLink4URL=https://datasheet.ciiva.com/7841/1697337-7841861.pdf?src-supplier=Element14, ComponentLink5Description=https://datasheet.ciiva.com/26317/fld-crcw-e3-data-en-26317147.pdf?src-supplier=Distrelec, ComponentLink5URL=https://datasheet.ciiva.com/26317/fld-crcw-e3-data-en-26317147.pdf?src-supplier=Distrelec, ComponentLink6Description=https://datasheet.ciiva.com/7841/1697337-7841690.pdf?src-supplier=Element14, ComponentLink6URL=https://datasheet.ciiva.com/7841/1697337-7841690.pdf?src-supplier=Element14, ComponentLink7Description=https://datasheet.ciiva.com/22683/1847332-22683327.pdf?src-supplier=Element14, ComponentLink7URL=https://datasheet.ciiva.com/22683/1847332-22683327.pdf?src-supplier=Element14, ComponentLink8Description=https://datasheet.ciiva.com/2525/dcrcwe3-2525723.pdf?src-supplier=Digi-Key, ComponentLink8URL=https://datasheet.ciiva.com/2525/dcrcwe3-2525723.pdf?src-supplier=Digi-Key, ComponentLink9Description=https://datasheet.ciiva.com/2525/dcrcwe3-2525724.pdf?src-supplier=Digi-Key, ComponentLink9URL=https://datasheet.ciiva.com/2525/dcrcwe3-2525724.pdf?src-supplier=Digi-Key, ComponentLink10Description=https://datasheet.ciiva.com/9065/dcrcwe3-9065422.pdf?src-supplier=Avnet, ComponentLink10URL=https://datasheet.ciiva.com/9065/dcrcwe3-9065422.pdf?src-supplier=Avnet, Contact Plating=Tin, Depth=1.25mm, Features="Automotive AEC-Q200", Height=0.45mm, Item Type=Resistor, Length=2mm, Manufacturer Part Number=CRCW08055K60FKEA, Number of Terminations=2, Packaging="Tape and Reel", Pins=2, Power Rating=125mW, Pricing="1250=0.024, 2500=0.013, 4000=0.015, 5000=0.011 (GBP)", Reach SVHC Compliant=Unknown, RoHS=Yes, RoHS Compliant=Yes, Series=CRCW, Stock=100250, Supplier=Rs, Technology="THICK FILM", Termination=SMD/SMT, Tolerance=1%, Voltage Rating (DC)=150V, Weight=0.000194oz, Width=1.25mm
R35: library part RK73G1JTTD1002F, "RES 10K OHM 1% 1/10W 0603", Case Code (Imperial)=0603, Case Code (Metric)=1608, LCSC Part Number=C362180, Max Operating Temperature=125°C, Min Operating Temperature=-55°C, Power Rating=100mW, Supplier Part Number=2019-RK73G1JTTD1002FCT-ND, Temperature Coefficient=50ppm/°C, Tolerance=1%, Voltage Rating=75V, Case/Package=0603, Category="Chip SMD Resistors", ComponentLink1Description=LCSC, ComponentLink2Description=http://www.mouser.com/ds/2/219/RK73G-9863.pdf?src-supplier=Mouser, ComponentLink2URL=http://www.mouser.com/ds/2/219/RK73G-9863.pdf?src-supplier=Mouser, Construction=Rectangular, Depth=0.8mm, Item Type=Resistor, Length=1.6mm, Military Standard=Not, Packaging="Tape and Reel", Pricing="1=0.22, 10=0.118, 50=0.0812, 100=0.0699, 500=0.0513, 1000=0.04545 (USD)", RoHS=Yes, RoHS Compliant=Yes, Series=RK73G, Stock=249394, Supplier=Digi-Key, Termination=SMD/SMT
R36: library part CR0603-FX-4991ELF, "RES SMD 4.99K OHM 1% 1/10W 0603", LCSC Part Number=C203645, Manufacturer=Bourns, Voltage Rating (DC)=50V, ComponentLink1Description=https://datasheet.ciiva.com/9122/chpreztr-9122757.pdf?src-supplier=Avnet, ComponentLink1URL=https://datasheet.ciiva.com/9122/chpreztr-9122757.pdf?src-supplier=Avnet, ComponentLink2Description=https://datasheet.ciiva.com/6547/chpreztr-6547333.pdf?src-supplier=Digikey, ComponentLink2URL=https://datasheet.ciiva.com/6547/chpreztr-6547333.pdf?src-supplier=Digikey, ComponentLink3Description=https://datasheet.ciiva.com/6547/chpreztr-6547335.pdf?src-supplier=Digikey, ComponentLink3URL=https://datasheet.ciiva.com/6547/chpreztr-6547335.pdf?src-supplier=Digikey, Item Type=Resistor, Manufacturer Part Number=CR0603-FX-4991ELF, Pricing="1=0.1, 10=0.014, 25=0.0108, 50=0.008, 100=0.0057, 250=0.00456, 500=0.00364, 1000=0.00268 (USD)", RoHS=Yes, RoHS Compliant=5897YesNo, Stock=84955, Supplier=Digikey, Thickness=457um
R37 R38: library part RC0402FR-070RL, "RES 0 OHM JUMPER 1/16W 0402", Case Code (Imperial)=0402, Case Code (Metric)=1005, LCSC Part Number=C106231, Manufacturer=Yageo, Max Operating Temperature=155°C, Max Power Dissipation=63mW, Min Operating Temperature=-55°C, Power Rating=62.5mW, Resistor Type="Thick Film", Supplier Part Number 1=603-RC0402FR-070RL, Temperature Coefficient=200ppm/°C, Tolerance=1%, Voltage Rating=50V, Case/Package=0402, ComponentLink1Description=https://datasheet.ciiva.com/8896/pyu-rc0402-51-rohs-l-6-8896149.pdf?src-supplier=Avnet, ComponentLink1URL=https://datasheet.ciiva.com/8896/pyu-rc0402-51-rohs-l-6-8896149.pdf?src-supplier=Avnet, ComponentLink2Description=https://datasheet.ciiva.com/16790/pyu-rc0402-51-rohs-l-6-r-16790444.pdf?src-supplier=Future+Electronics, ComponentLink2URL=https://datasheet.ciiva.com/16790/pyu-rc0402-51-rohs-l-6-r-16790444.pdf?src-supplier=Future+Electronics, Contact Plating=Tin,Matte, Features="Moisture Resistant", Height=0.35mm, Item Type=Resistors, Lead Free="Lead Free", Length=1mm, Manufacturer Part Number=RC0402FR-070RL, Mount="Surface Mount", Number of Terminations=2, Packaging="Tape and Reel", Pricing 1="1=0.10000, 10=0.01400, 50=0.01400, 100=0.00600, 1000=0.00300, 5000=0.00200, 10000=0.00100 (USD)", Radiation Hardening=No, Resistance=0R, RoHS=Yes, RoHS Compliant=Yes, Series=RC, Size Code=0402, Stock 1=8556842, Supplier 1=Mouser, Termination=SMD/SMT, Width=0.5mm
R39 R40 R41: library part RC1206FR-071K65L, "RES 1.65K OHM 1% 1/4W 1206", LCSC Part Number=C488588, Manufacturer=Yageo, ComponentLink1Description=https://datasheet.ciiva.com/15159/getdatasheetpartid-45723-15159541.pdf?src-supplier=Verical, ComponentLink1URL=https://datasheet.ciiva.com/15159/getdatasheetpartid-45723-15159541.pdf?src-supplier=Verical, ComponentLink2Description=https://datasheet.ciiva.com/17086/pyu-rc1206-51-rohs-l-4-17086185.pdf?src-supplier=Future+Electronics, ComponentLink2URL=https://datasheet.ciiva.com/17086/pyu-rc1206-51-rohs-l-4-17086185.pdf?src-supplier=Future+Electronics, Item Type=Resistor, Manufacturer Part Number=RC1206FR-071K65L, Pricing="1=0.1, 10=0.038, 50=0.0244, 100=0.0206, 500=0.01434, 1000=0.01248 (USD)", RoHS=Yes, Stock=18321, Supplier=Digikey
R42: library part RC0603FR-072R2L, "RES 2.2 OHM 1% 1/10W 0603", Case Code (Imperial)=0603, Case Code (Metric)=1608, LCSC Part Number=C112307, Manufacturer=Yageo, Max Operating Temperature=155°C, Max Power Dissipation=100mW, Min Operating Temperature=-55°C, Package Quantity=1, Resistance Tolerance=1%, Resistor Type="Thick Film", Temperature Coefficient=200ppm/°C, Voltage Rating=50V, Case/Package=0603, ComponentLink1Description=https://datasheet.ciiva.com/11808/0900766b80f96399-11808160.pdf?src-supplier=Rs, ComponentLink1URL=https://datasheet.ciiva.com/11808/0900766b80f96399-11808160.pdf?src-supplier=Rs, ComponentLink2Description=https://datasheet.ciiva.com/2554/pyu-r-int-thick-7-2554421.pdf?src-supplier=Digikey, ComponentLink2URL=https://datasheet.ciiva.com/2554/pyu-r-int-thick-7-2554421.pdf?src-supplier=Digikey, ComponentLink3Description=https://datasheet.ciiva.com/2554/pyu-r-int-thick-7-2554422.pdf?src-supplier=Digikey, ComponentLink3URL=https://datasheet.ciiva.com/2554/pyu-r-int-thick-7-2554422.pdf?src-supplier=Digikey, ComponentLink4Description=https://datasheet.ciiva.com/2554/pyu-r-int-thick-7-2554420.pdf?src-supplier=Digikey, ComponentLink4URL=https://datasheet.ciiva.com/2554/pyu-r-int-thick-7-2554420.pdf?src-supplier=Digikey, Depth=0.8mm, Features="Moisture Resistant", Height=0.022inch, Item Type=Resistors, Lead Free="Lead Free", Length=0.063inch, Manufacturer Part Number=RC0603FR-072R2L, Number of Terminations=2, Packaging="Tape and Reel", Pins=2, Power Rating=100mW, Pricing="1=0.1, 10=0.029, 50=0.0188, 100=0.0158, 500=0.01094, 1000=0.00947 (USD)", Reach SVHC Compliant=No, RoHS=Yes, RoHS Compliant=Yes, Series=RC, Stock=331140, Supplier=Digikey, Technology="THICK FILM", Termination=SMD/SMT, Tolerance=1%, Voltage Rating (DC)=50V, Width=0.031inch
R43 R44 R46: library part RC1206FR-074M99L, "RES 4.99M OHM 1% 1/4W 1206", Case Code (Imperial)=1206, Case Code (Metric)=3216, LCSC Part Number=C488845, Manufacturer=Yageo, Max Operating Temperature=155°C, Max Power Dissipation=250mW, Min Operating Temperature=-55°C, Package Quantity=1, Temperature Coefficient=100ppm/°C, Tolerance=1%, Voltage Rating=200V, Case/Package=1206, ComponentLink1Description=https://datasheet.ciiva.com/2521/pyu-rc1206-51-rohs-l-4-2521020.pdf?src-supplier=Digikey, ComponentLink1URL=https://datasheet.ciiva.com/2521/pyu-rc1206-51-rohs-l-4-2521020.pdf?src-supplier=Digikey, ComponentLink2Description=https://datasheet.ciiva.com/2521/pyu-rc1206-51-rohs-l-4-2521021.pdf?src-supplier=Digikey, ComponentLink2URL=https://datasheet.ciiva.com/2521/pyu-rc1206-51-rohs-l-4-2521021.pdf?src-supplier=Digikey, ComponentLink3Description=https://datasheet.ciiva.com/2521/pyu-rc1206-51-rohs-l-4-2521019.pdf?src-supplier=Digikey, ComponentLink3URL=https://datasheet.ciiva.com/2521/pyu-rc1206-51-rohs-l-4-2521019.pdf?src-supplier=Digikey, Contact Plating=Tin,Matte, Features="Moisture Resistant", Height=0.026inch, Item Type=Resistors, Lead Free="Lead Free", Length=0.122inch, Manufacturer Part Number=RC1206FR-074M99L, Number of Terminations=2, Packaging="Tape and Reel", Power Rating=250mW, Pricing="1=0.1, 10=0.038, 50=0.0244, 100=0.0206, 500=0.01434, 1000=0.01248 (USD)", RoHS=Yes, RoHS Compliant=Yes, Series=RC, Stock=11560, Supplier=Digikey, Termination=SMD/SMT, Voltage Rating (DC)=200V, Width=0.063inch
R45: library part RC0603FR-07274KL, "RES 274K OHM 1% 1/10W 0603", LCSC Part Number=C482818, Manufacturer=Yageo, ComponentLink1Description=https://datasheet.ciiva.com/2454/pyu-r-int-thick-7-2454960.pdf?src-supplier=Digikey, ComponentLink1URL=https://datasheet.ciiva.com/2454/pyu-r-int-thick-7-2454960.pdf?src-supplier=Digikey, ComponentLink2Description=https://datasheet.ciiva.com/2454/pyu-r-int-thick-7-2454961.pdf?src-supplier=Digikey, ComponentLink2URL=https://datasheet.ciiva.com/2454/pyu-r-int-thick-7-2454961.pdf?src-supplier=Digikey, ComponentLink3Description=https://datasheet.ciiva.com/2454/pyu-r-int-thick-7-2454962.pdf?src-supplier=Digikey, ComponentLink3URL=https://datasheet.ciiva.com/2454/pyu-r-int-thick-7-2454962.pdf?src-supplier=Digikey, Item Type=Resistors, Manufacturer Part Number=RC0603FR-07274KL, Pricing="1=0.1, 10=0.019, 50=0.0114, 100=0.0094, 500=0.00632, 1000=0.0054 (USD)", RoHS=Yes, Stock=204071, Supplier=Digikey
R47: library part CRCW0603100RFKEA, "RES SMD 100 OHM 1% 1/10W 0603", Case Code (Imperial)=0603, Case Code (Metric)=1608, LCSC Part Number=C844917, Manufacturer="Vishay Dale", Max Operating Temperature=155°C, Max Power Dissipation=100mW, Min Operating Temperature=-55°C, Package Quantity=10, Ratings=AEC-Q200, Resistance Tolerance=1%, Resistor Type="Thick Film", Temperature Coefficient=100ppm/°C, Voltage Rating=75V, Case/Package=0603, ComponentLink1Description=https://datasheet.ciiva.com/22666/1720486-22666207.pdf?src-supplier=Element14, ComponentLink1URL=https://datasheet.ciiva.com/22666/1720486-22666207.pdf?src-supplier=Element14, ComponentLink2Description=https://datasheet.ciiva.com/26316/fld-crcw-e3-data-en-26316566.pdf?src-supplier=Distrelec, ComponentLink2URL=https://datasheet.ciiva.com/26316/fld-crcw-e3-data-en-26316566.pdf?src-supplier=Distrelec, ComponentLink3Description=https://datasheet.ciiva.com/22673/1697337-22673066.pdf?src-supplier=Element14, ComponentLink3URL=https://datasheet.ciiva.com/22673/1697337-22673066.pdf?src-supplier=Element14, ComponentLink4Description=https://datasheet.ciiva.com/2465/dcrcwe3-2465544.pdf?src-supplier=Digikey, ComponentLink4URL=https://datasheet.ciiva.com/2465/dcrcwe3-2465544.pdf?src-supplier=Digikey, ComponentLink5Description=https://datasheet.ciiva.com/2465/dcrcwe3-2465545.pdf?src-supplier=Digikey, ComponentLink5URL=https://datasheet.ciiva.com/2465/dcrcwe3-2465545.pdf?src-supplier=Digikey, ComponentLink6Description=https://datasheet.ciiva.com/2465/dcrcwe3-2465543.pdf?src-supplier=Digikey, ComponentLink6URL=https://datasheet.ciiva.com/2465/dcrcwe3-2465543.pdf?src-supplier=Digikey, ComponentLink7Description=https://datasheet.ciiva.com/16721/70201119-16721486.pdf?src-supplier=Allied+Electronics, ComponentLink7URL=https://datasheet.ciiva.com/16721/70201119-16721486.pdf?src-supplier=Allied+Electronics, ComponentLink8Description=https://datasheet.ciiva.com/16787/70201119-16787964.pdf?src-supplier=Allied+Electronics, ComponentLink8URL=https://datasheet.ciiva.com/16787/70201119-16787964.pdf?src-supplier=Allied+Electronics, ComponentLink9Description=https://datasheet.ciiva.com/5550/dcrcwe3-109170-5550286.pdf?src-supplier=Mouser, ComponentLink9URL=https://datasheet.ciiva.com/5550/dcrcwe3-109170-5550286.pdf?src-supplier=Mouser, ComponentLink10Description=https://datasheet.ciiva.com/16199/dcrcwe3-16199102.pdf?src-supplier=Future+Electronics, ComponentLink10URL=https://datasheet.ciiva.com/16199/dcrcwe3-16199102.pdf?src-supplier=Future+Electronics, Construction=Rectangular, Depth=0.85mm, Features="Automotive AEC-Q200", Height=0.02inch, Item Type=Resistors, Lead Free=5697LeadFree, Length=1.55mm, Manufacturer Part Number=CRCW0603100RFKEA, Military Standard=Not, Number of Terminations=2, Packaging="Tape and Reel", Pins=2NUMBER, Power Rating=100mW, Pricing="1=0.1, 10=0.017, 50=0.017, 100=0.01, 1000=0.008, 10000=0.004 (USD)", Reach SVHC Compliant=Unknown, RoHS=Yes, RoHS Compliant=Yes, Series=CRCW, Stock=584918, Supplier=Mouser, Termination=SMD/SMT, Tolerance=1%, Voltage Rating (DC)=75V, Weight=7.1E-05oz, Width=0.033inch
R48: library part RT0603BRE07301KL, "RES SMD 301K OHM 0.1% 1/10W 0603", Case/Package=0603, LCSC Part Number=C326750, Manufacturer=Yageo, Max Operating Temperature=125°C, Max Power Dissipation=100mW, Min Operating Temperature=-55°C, Package Quantity=5000, Resistance=301kR, Resistor Type="Thin Film", Supplier Part Number 1=603-RT0603BRE07301KL, Temperature Coefficient=50ppm/°C, Tolerance=0.1%, Voltage Rating (DC)=50V, Category="Chip SMD Resistors", ComponentLink1Description=https://datasheet.ciiva.com/2584/pyu-rt-1-to-0-05-rohs-l-5-2584420.pdf?src-supplier=Digi-Key, ComponentLink1URL=https://datasheet.ciiva.com/2584/pyu-rt-1-to-0-05-rohs-l-5-2584420.pdf?src-supplier=Digi-Key, Height=0.022inch, Item Type=Resistor, Lead Free="Lead Free", Length=0.063inch, Manufacturer Part Number=RT0603BRE07301KL, Number of Terminations=2, Packaging="Tape and Reel", Pricing 1="1=0.42000, 10=0.30200, 50=0.30200, 100=0.12100, 1000=0.06000, 10000=0.04900 (USD)", RoHS=Yes, RoHS Compliant=Yes, Series=RT, Stock 1=2800, Supplier 1=Mouser, Width=0.031inch